# Altium PCB Layout.PcbDoc
Units mm, origin at the board's own origin, x right, y up, seen from the top; angles counter-clockwise.
Board outline 68.5 x 50 mm, 4 copper layers (Top Layer, Ground Layer, Signal Layer, Bottom Layer), stack 1.591 mm thick; 69 components, 34 nets, 219 pads, 163 vias.
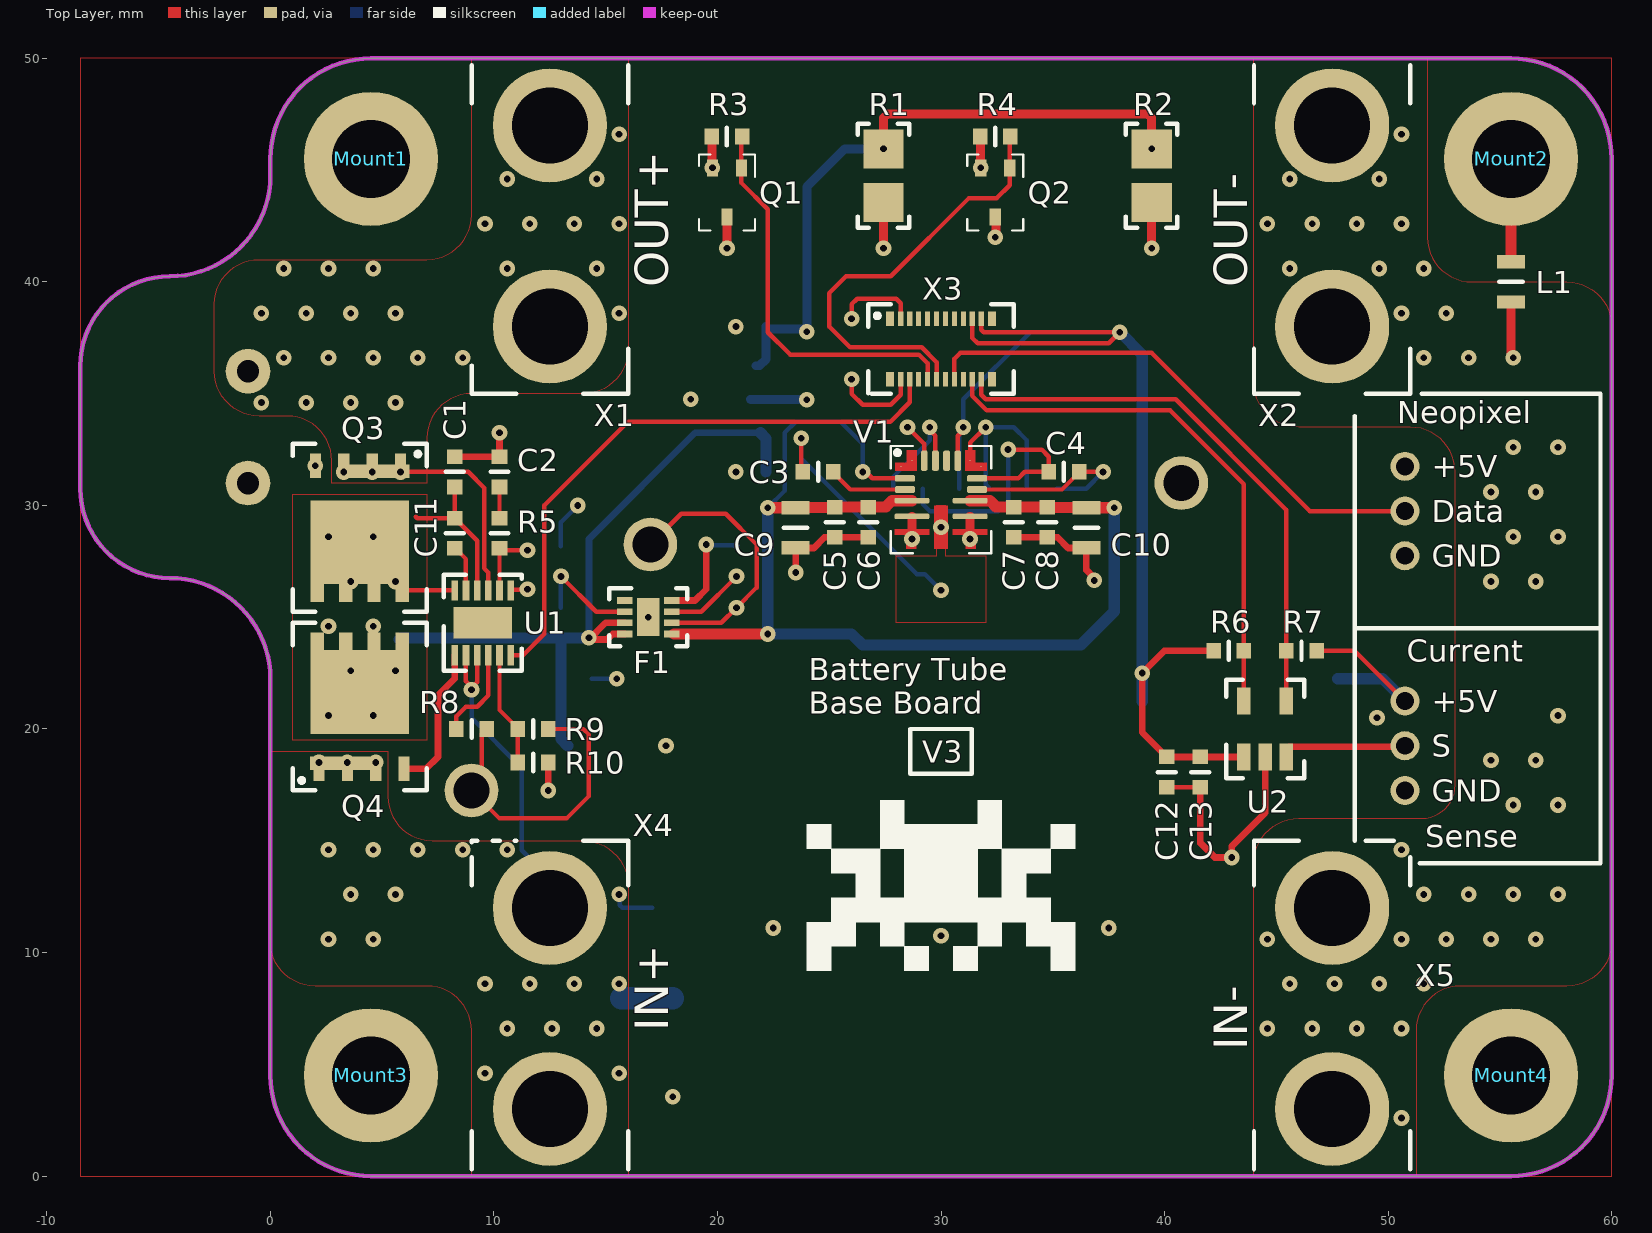
[diagram p0: Top Layer view]
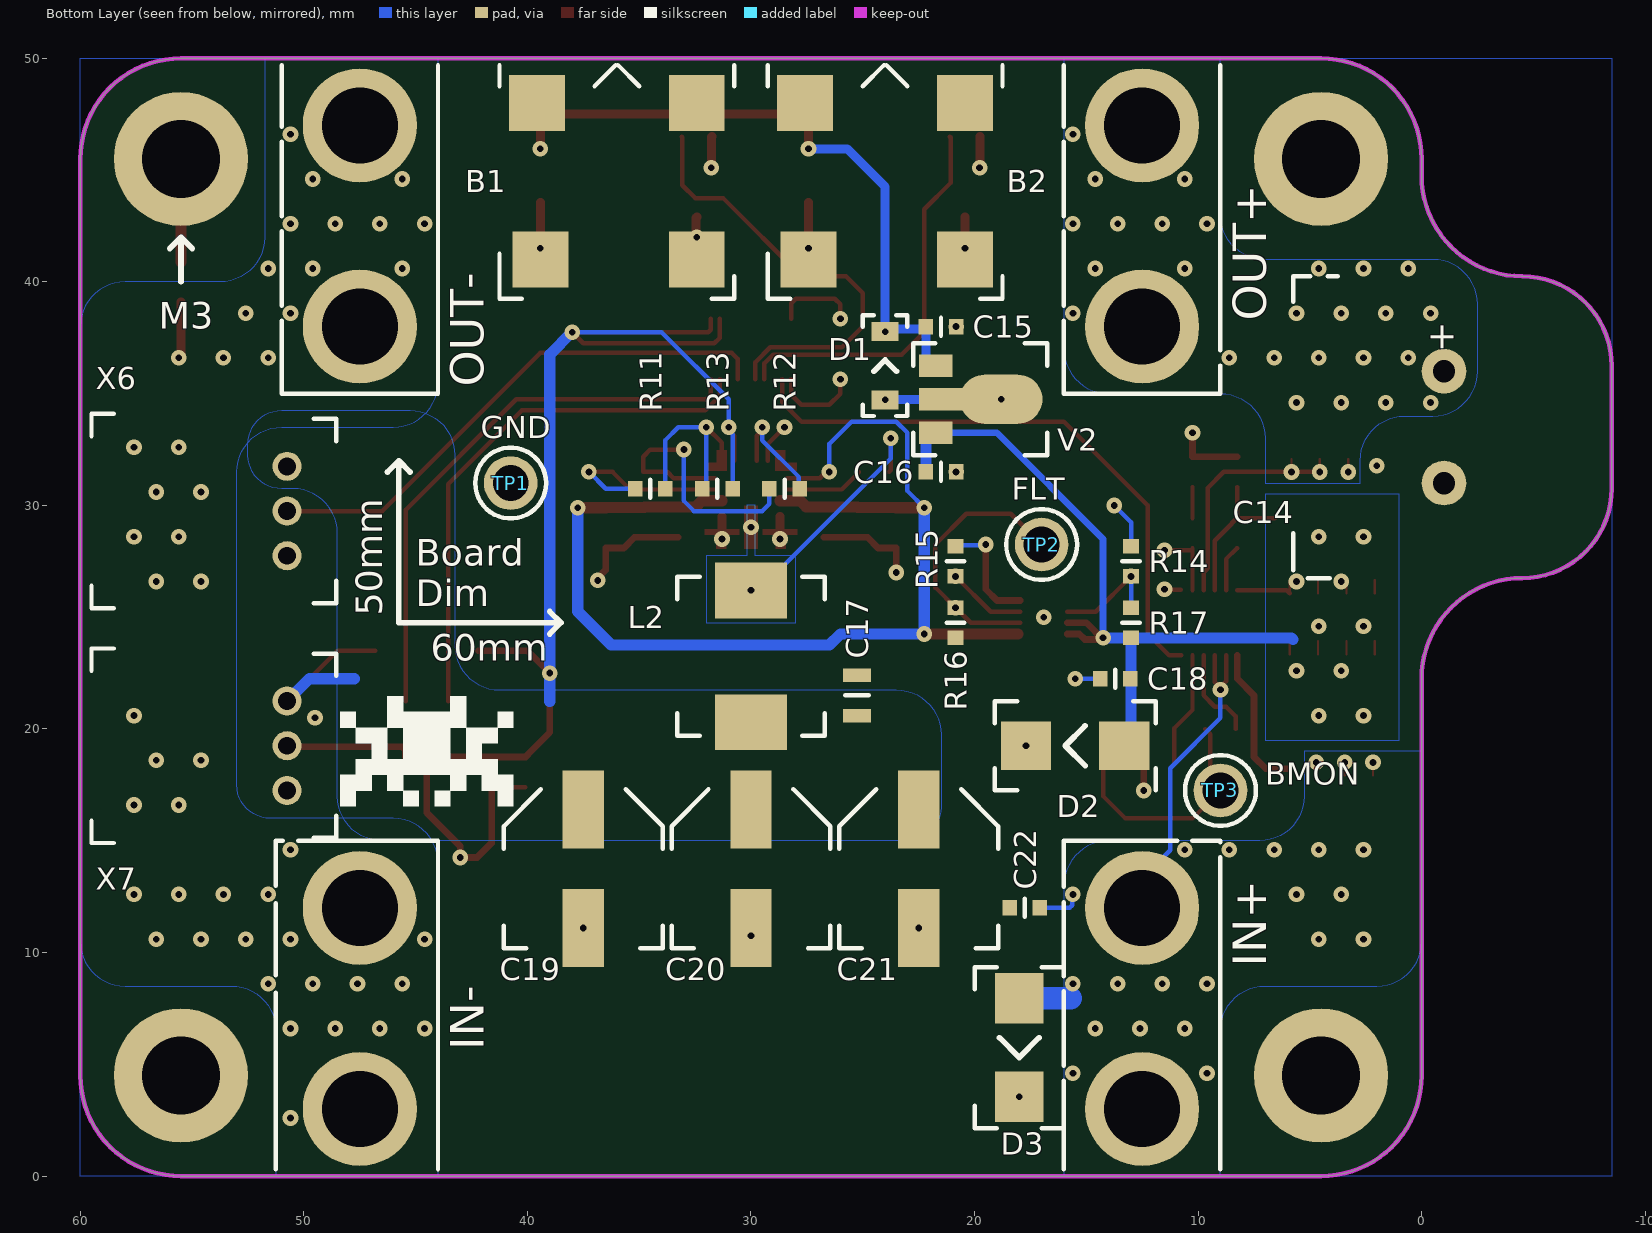
[diagram p1: Bottom Layer view, seen from below]
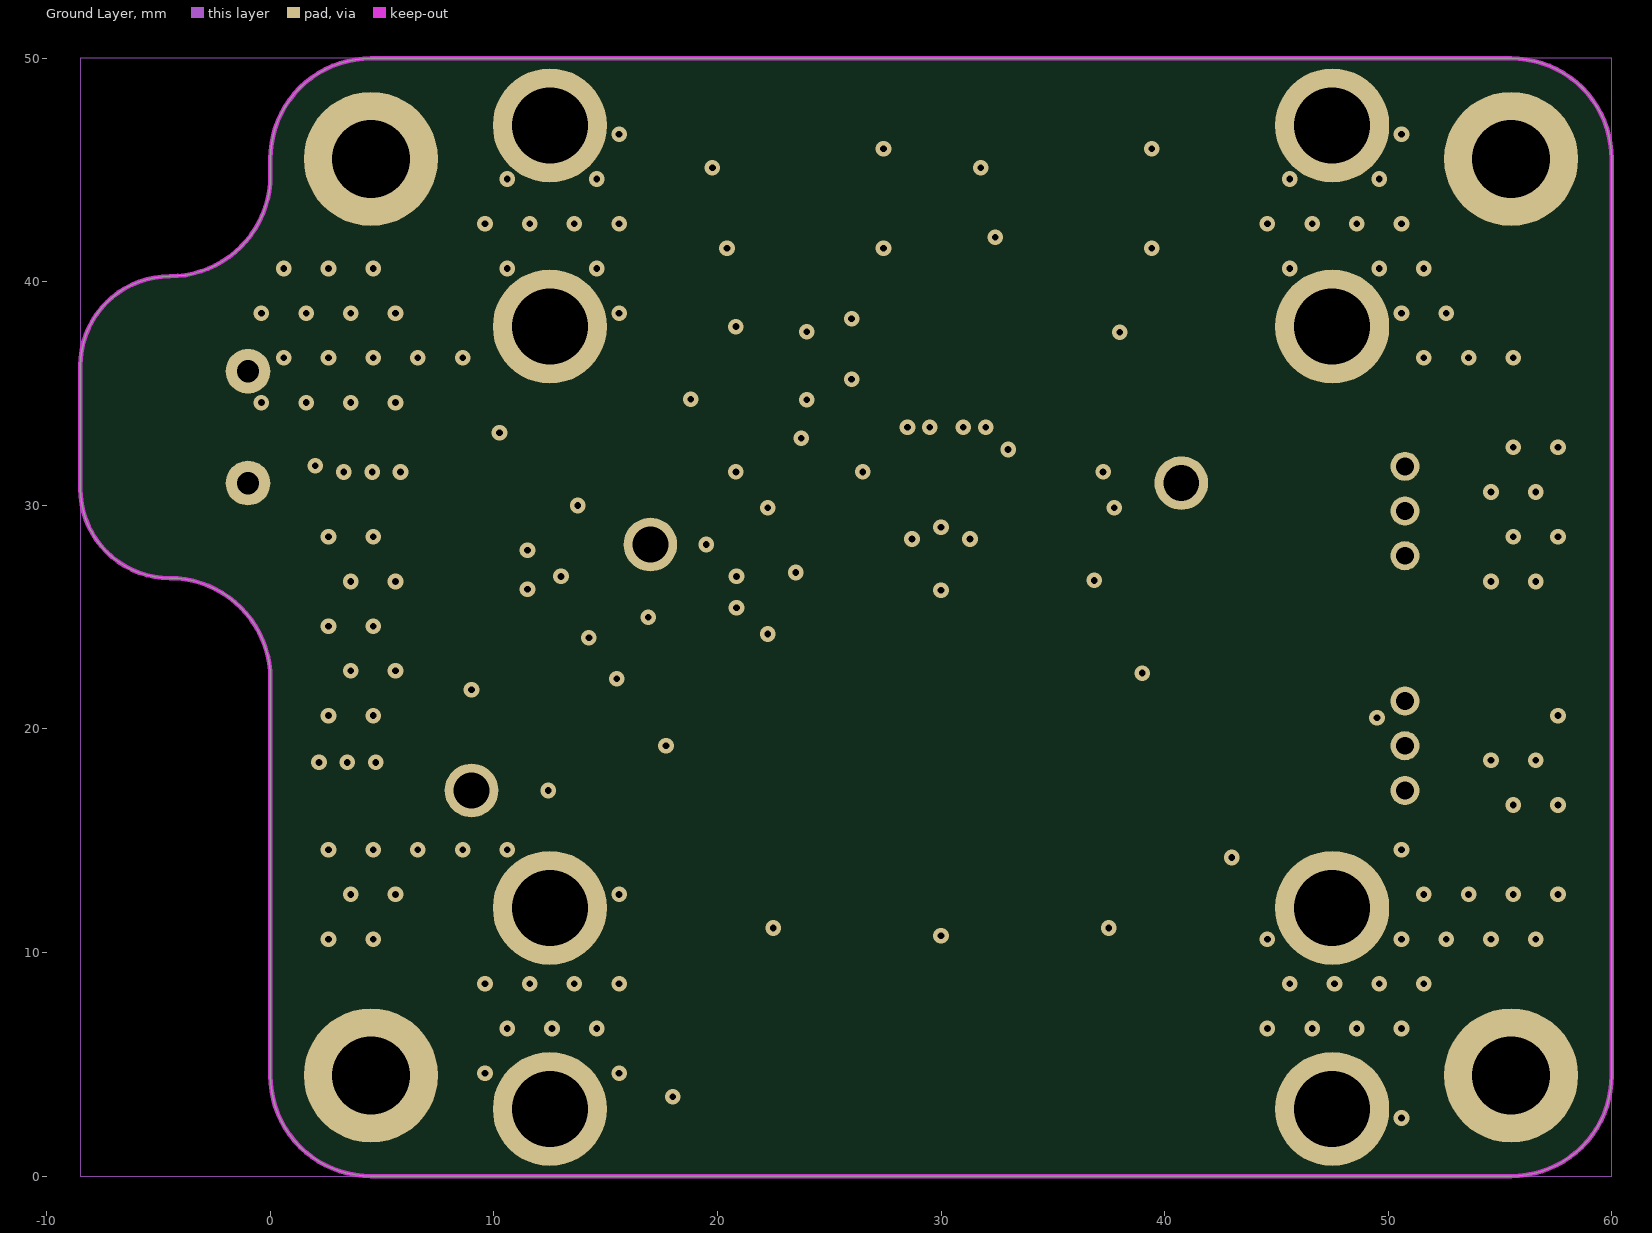
[diagram p2: Ground Layer]
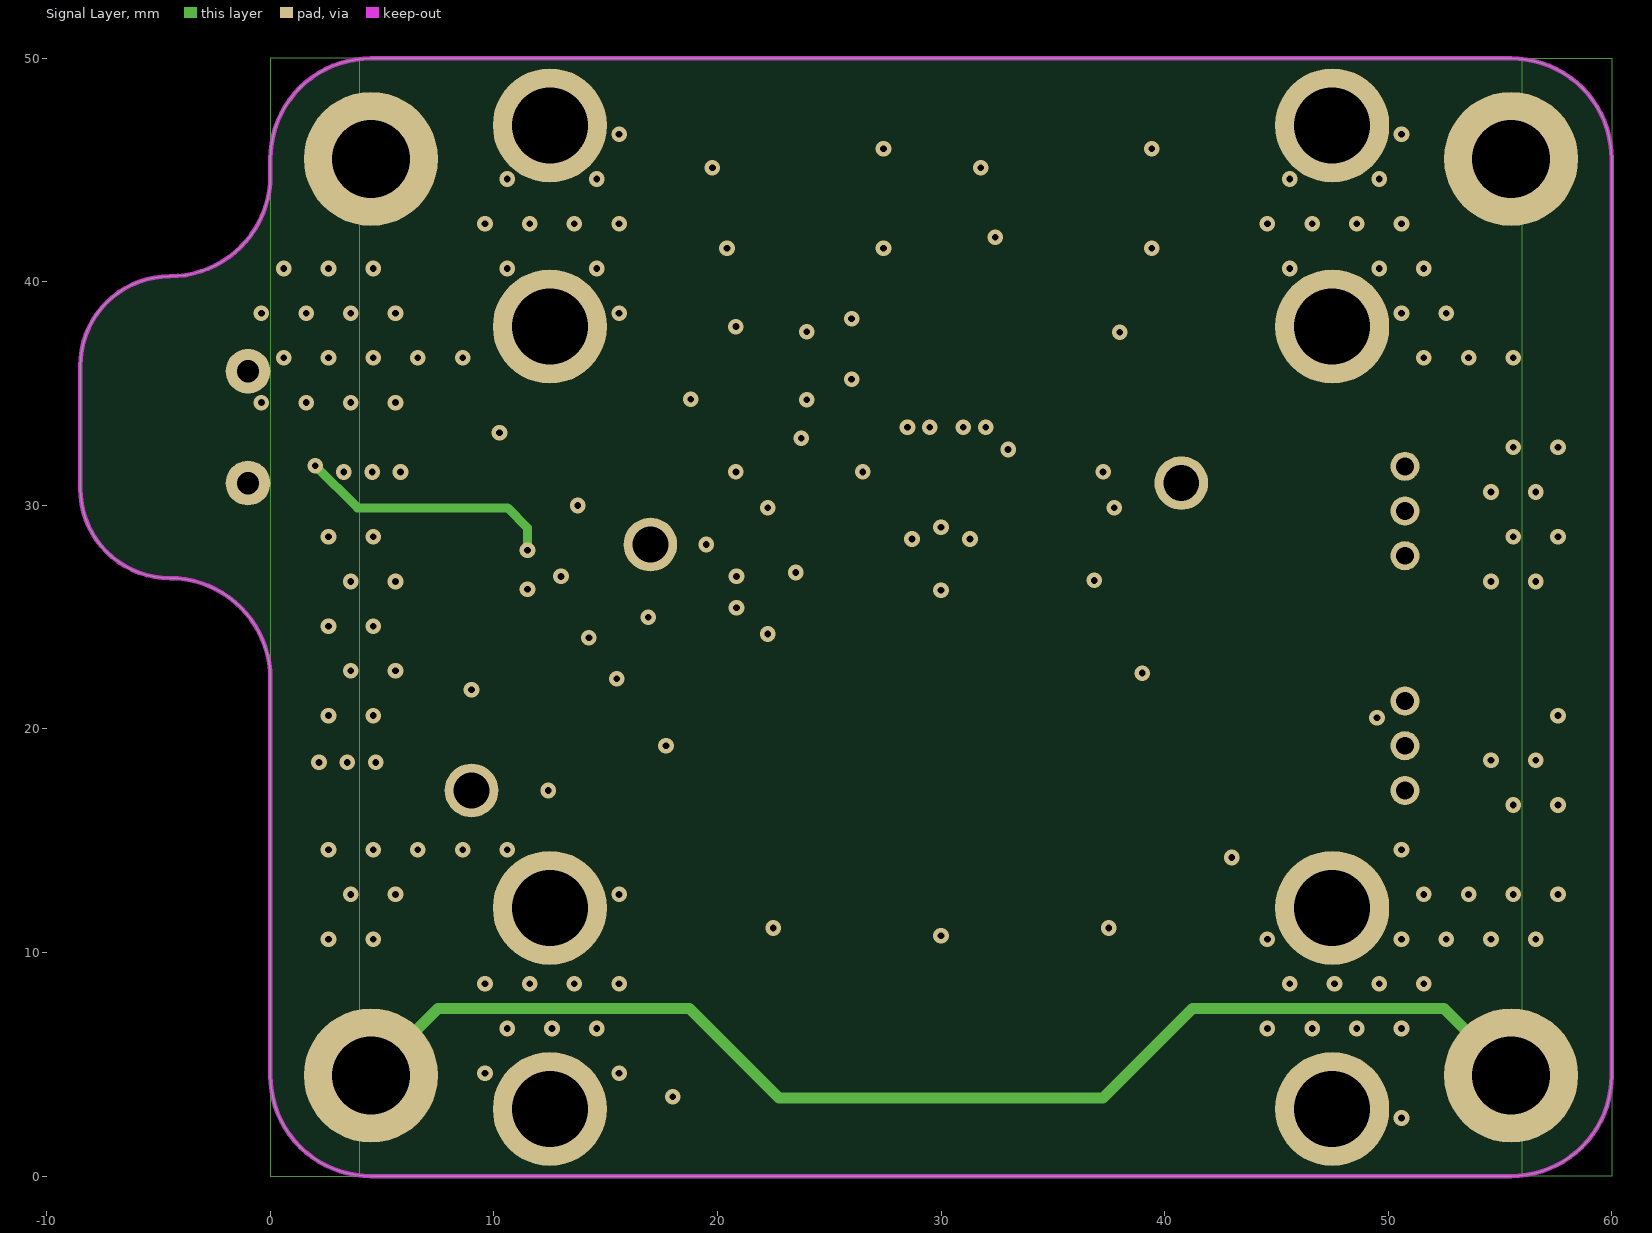
[diagram p3: Signal Layer]

## Layer stack, top to bottom
Top Solder: solder mask 0.0102, Solder Resist, Dk 3.8
Top Layer: signal copper 0.035
Dielectric 2: prepreg 0.2104, 7628*1, Dk 4.4
Ground Layer: signal copper 0.0175
Dielectric 1: dielectric 1.065, FR-4, Dk 4.8
Signal Layer: signal copper 0.0175
Dielectric 3: prepreg 0.2104, 7628*1, Dk 4.4
Bottom Layer: signal copper 0.035
Bottom Solder: solder mask 0.0102, Solder Resist, Dk 3.8

## Board outline
-8.5,30.75 -8.5,36.25 cw(c-4.5,36.25) -4.5,40.25 ccw(c-4.5,44.75) 0,44.75 0,45.5 cw(c4.5,45.5) 4.5,50 55.5,50 cw(c55.5,45.5) 60,45.5 60,4.5 cw(c55.5,4.5) 55.5,0 4.5,0 cw(c4.5,4.5) 0,4.5 0,22.25 ccw(c-4.5,22.25) -4.5,26.75 cw(c-4.5,30.75)

## Design rules (kind name [scope] priority, off if disabled: settings)
BoardOutlineClearance [All] p1: gap=0.2 ignorepadtopadclearanceinfootprint=FALSE
Clearance "inPolygon Clearance" [InPolygon] p1: gap=0.3 ignorepadtopadclearanceinfootprint=TRUE // this rule ensures that every net within a polygon of a different net has a set clearance from the poly
Clearance "High Current Polygon Clearance" [(InPolygon AND InNetClass('High_Current_Nets'))] p2: gap=0 ignorepadtopadclearanceinfootprint=TRUE // this rule ensures that every net within a polygon of a different net has a set clearance from the poly
Clearance "Different Diff Pair" [All] p3: gap=0.2 ignorepadtopadclearanceinfootprint=TRUE
Clearance "Same Diff Pair" [All] p4: gap=0.1 ignorepadtopadclearanceinfootprint=TRUE
Clearance "Different Nets" [not InAnyDifferentialPair] p5: gap=0.3 ignorepadtopadclearanceinfootprint=TRUE except(0.1: Arc-SMDPad Arc-THPad Arc-Via Arc-Text Track-SMDPad Track-THPad Track-Via Track-Text SMDPad-Text THPad-Text Via-Text Fill-Text Poly-Text Region-Text Text-Text; 0.12: Arc-Arc Arc-Track Track-Track; 0.15: SMDPad-SMDPad SMDPad-THPad SMDPad-Via THPad-THPad THPad-Via Via-Via; 0.2: Arc-Hole Track-Hole SMDPad-Hole THPad-Hole Via-Hole Fill-Hole Poly-Hole Region-Hole Text-Hole)
Clearance "Same Net" [not InAnyDifferentialPair] p6: gap=0 ignorepadtopadclearanceinfootprint=TRUE except(0.1: THPad-Via; 0.18: Arc-Arc Arc-Track Track-Track)
ComponentClearance [All] p1: gap=0.102 collisioncheckmode=3 verticalgap=0.102 showdistances=TRUE
DiffPairsRouting "Ethernet Routing" [InDifferentialPairClass('Ethernet_Pairs')] p1: maxlimit=0.25 minlimit=0.2 mostfreqgap=0.25 toplayer_maxgap=0.2 toplayer_prefgap=0.2 toplayer_minwidth=0.25 toplayer_maxwidth=0.25 toplayer_prefwidth=0.25 midlayer1_mingap=0.25 midlayer1_minwidth=0.19 midlayer1_maxwidth=0.19 midlayer1_prefwidth=0.19 midlayer2_mingap=0.25 midlayer2_minwidth=0.19 midlayer2_maxwidth=0.19 midlayer2_prefwidth=0.19 bottomlayer_maxgap=0.2 bottomlayer_prefgap=0.2 bottomlayer_minwidth=0.25 bottomlayer_maxwidth=0.25 bottomlayer_prefwidth=0.25 impedanceprofiledriven=TRUE maxuncoupledlength=12.7
DiffPairsRouting "USB Routing" [InDifferentialPairClass('USB_Pairs')] p2: maxlimit=0.291 minlimit=0.127 mostfreqgap=0.291 toplayer_maxgap=0.127 toplayer_prefgap=0.127 toplayer_minwidth=0.23 toplayer_maxwidth=0.23 toplayer_prefwidth=0.23 midlayer1_mingap=0.291 midlayer1_minwidth=0.25 midlayer1_maxwidth=0.25 midlayer1_prefwidth=0.25 midlayer2_mingap=0.291 midlayer2_minwidth=0.25 midlayer2_maxwidth=0.25 midlayer2_prefwidth=0.25 bottomlayer_maxgap=0.127 bottomlayer_prefgap=0.127 bottomlayer_minwidth=0.23 bottomlayer_maxwidth=0.23 bottomlayer_prefwidth=0.23 maxuncoupledlength=12.7
DiffPairsRouting "CAN Routing" [InDifferentialPairClass('CAN_Pairs')] p3: maxlimit=0.907 minlimit=0.5 mostfreqgap=0.907 toplayer_maxgap=0.5 toplayer_prefgap=0.5 toplayer_minwidth=0.201 toplayer_maxwidth=0.201 toplayer_prefwidth=0.201 midlayer1_mingap=0.907 midlayer1_minwidth=0.155 midlayer1_maxwidth=0.155 midlayer1_prefwidth=0.155 midlayer2_mingap=0.907 midlayer2_minwidth=0.155 midlayer2_maxwidth=0.155 midlayer2_prefwidth=0.155 bottomlayer_maxgap=0.5 bottomlayer_prefgap=0.5 bottomlayer_minwidth=0.201 bottomlayer_maxwidth=0.201 bottomlayer_prefwidth=0.201 impedanceprofiledriven=TRUE maxuncoupledlength=12.7
Height [All] p1: minheight=0 maxheight=1816.048 prefheight=12.7
HoleSize [All] p1: absolutevalues=TRUE maxlimit=6.3 minlimit=0.3 maxpercent=80.000 minpercent=20.000
HoleToHoleClearance [All] p1: gap=0.25 allowstackedmicrovias=FALSE
MatchedLengths "XTAL Nets Matched Delays" [InNetClass('XTAL_Nets')] p1: tolerance=25.4 checknetsindiffpair=FALSE checkdiffpairvsdiffpair=TRUE checkxsignals=TRUE checkothers=TRUE usedelayunits=TRUE delaytolerance=10.000000
MatchedLengths "Diff Pair Matched Delays" [InDifferentialPairClass('Ethernet_Pairs') or InDifferentialPairClass('USB_Pairs') or InDifferentialPairClass('CAN_Pairs')] p2: tolerance=5 checknetsindiffpair=TRUE checkdiffpairvsdiffpair=FALSE checkxsignals=FALSE checkothers=FALSE usedelayunits=TRUE delaytolerance=100.000000 phasematching=TRUE phasedelaytolerance=5.000000 phasedistance=12.7
MinimumAnnularRing [All] p1: minimumring=0.2
MinimumSolderMaskSliver [All] p1: minsoldermaskwidth=0
PlaneClearance "Supply Net Clearance" [InNetClass('Supply_Nets')] p1: clearance=0.5
PlaneClearance "All Nets" [All] p2: clearance=0.3
PolygonConnect "High Current" [InNetClass('High_Current_Nets')] p1: thpad.connectstyle=Relief thpad.reliefconductorwidth=0.4 thpad.reliefentries=4 thpad.polygonreliefangle="90 Angle" thpad.airgapwidth=0.1 thpad.conductorbypadedge=TRUE thpad.mindistance=0.381 thpad.enablemindistance=FALSE smdpad.connectstyle=Direct smdpad.reliefconductorwidth=0.254 smdpad.reliefentries=4 smdpad.polygonreliefangle="90 Angle" smdpad.airgapwidth=0.254 via.connectstyle=Direct via.reliefconductorwidth=0.254 via.reliefentries=4 via.polygonreliefangle="90 Angle" via.airgapwidth=0.254
PolygonConnect "Supply Nets" [InNetClass('Supply_Nets')] p2: connectstyle=Relief reliefconductorwidth=0.3 reliefentries=4 polygonreliefangle="90 Angle" conductorbypadedge=TRUE mindistance=0.381 enablemindistance=FALSE airgapwidth=0.254
PolygonConnect General [All] p3: connectstyle=Relief reliefconductorwidth=0.254 reliefentries=4 polygonreliefangle="90 Angle" airgapwidth=0.254
RoutingVias [All] p1: holewidth=0.2 width=0.35 viastyle="Through Hole" minholewidth=0.15 minwidth=0.3 maxholewidth=6.3 maxwidth=6.55
SilkToSilkClearance [All] p1: silktosilkclearance=0
SilkToSolderMaskClearance [All] p1: minsilkscreentomaskgap=0 clearancetoexposedcopper=TRUE
SolderMaskExpansion [All] p1: expansion=0.075 istentingtop=FALSE
SupplyNets "Schematic Supply Nets_2" [InNet('+12V')] p1: voltage=0.000
SupplyNets "Schematic Supply Nets_3" [InNet('GND')] p2: voltage=0.000
SupplyNets "Schematic Supply Nets_1" [InNet('Earth')] p3: voltage=0.000
UnRoutedNet [All] p1: checkbadconnections=TRUE
Width "nRF Width" [InNetClass('nRF Signal')] p1: maxlimit=0.379 minlimit=0.263 preferedwidth=0.379 toplayer_minwidth=0.379 midlayer1_maxwidth=0.263 midlayer1_prefwidth=0.263 midlayer2_maxwidth=0.263 midlayer2_prefwidth=0.263 bottomlayer_minwidth=0.379 impedanceprofiledriven=TRUE minimp=50.000000 maximp=50.000000 favimp=50.000000 checkconnectedcopper=TRUE
Width [All] p2: maxlimit=100 minlimit=0.1 preferedwidth=0.2
20 further rules are at their usual default settings.

## Classes and differential pairs
component class "Current Sensor ADC": C12 C13 R6 R7 U2
component class Buzzer: B1 B2 Q1 Q2 R1 R2 R3 R4
net class High_Current_Nets: +5V_VIN BATT_always_on BATT_IN BATT_switched CAP DGATE GND HGATE NetC2_2 NetC3_2 VREG_IN
component class Power: C3 C4 C5 C6 C7 C8 C9 C10 C15 C16 C17 C18 C19 C20 C21 D1 D2 F1 L2 R11 R12 R13 R14 R15 R16 R17 V1 V2
component class ORing: C1 C2 C11 C14 C22 D3 Q3 Q4 R5 R8 R9 R10 U1
net class Supply_Nets: +12V BATT_always_on Earth GND
component class Connections: L1 Mount1 Mount2 Mount3 Mount4 TP1 TP2 TP3 X1 X2 X3 X4 X5 X6 X7

## Components (designator, comment, footprint, x,y, rotation, side; value= is the part's Value field where it differs from the comment)
B1 "Passive buzzer" "[Buzzer] Passive SMD 12V 80mA" 36,44.5 r90 bottom
B2 "Passive buzzer" "[Buzzer] Passive SMD 12V 80mA" 24,44.5 r90 bottom
C1 "[Cap] 0603 0.1uF 10% 50V" "[Cap] SMD 0603" 8.25,31.5 r270 top
C2 "[Cap] 0603 0.01uF 10% 50V" "[Cap] SMD 0603" 10.25,31.5 r270 top
C3 "[Cap] 0603 0.1uF 10% 50V" "[Cap] SMD 0603" 24.5,31.5 r180 top
C4 "[Cap] 0603 2.2uF 10% 25V" "[Cap] SMD 0603" 35.5,31.5 r180 top
C5 "[Cap] 0603 4.7uF 10% 25V" "[Cap] SMD 0603" 25.25,29.25 r90 top
C6 "[Cap] 0603 0.1uF 10% 50V" "[Cap] SMD 0603" 26.75,29.25 r90 top
C7 "[Cap] 0603 0.1uF 10% 50V" "[Cap] SMD 0603" 33.25,29.25 r90 top
C8 "[Cap] 0603 4.7uF 10% 25V" "[Cap] SMD 0603" 34.75,29.25 r90 top
C9 "[Cap] 0805 22uF 20% 25V" "[Cap] SMD 0805" 23.5,29 r90 top
C10 "[Cap] 0805 22uF 20% 25V" "[Cap] SMD 0805" 36.5,29 r90 top
C11 "[Cap] 0603 0.1uF 10% 50V" "[Cap] SMD 0603" 8.25,28.75 r90 top
C12 "[Cap] 0603 10uF 20% 16V" "[Cap] SMD 0603" 40.1,18.075 r90 top
C13 "[Cap] 0603 0.1uF 10% 50V" "[Cap] SMD 0603" 41.6,18.075 r90 top
C14 "[Cap] Thru-Hole 1000uF 20% 35V" "[Cap] Thru-Hole Polarized 10mm" -1,33.5 r270 bottom
C15 "[Cap] 0603 0.1uF 10% 50V" "[Cap] SMD 0603" 21.5,38 r0 bottom
C16 "[Cap] 0603 0.33uF 10% 50V" "[Cap] SMD 0603" 21.5,31.5 r0 bottom
C17 "[Cap] 0805 22uF 20% 25V" "[Cap] SMD 0805" 25.25,21.5 r270 bottom
C18 "[Cap] 0603 0.1uF 10% 50V" "[Cap] SMD 0603" 13.7,22.25 r180 bottom
C19 "[Cap] 6.3mm 47uF 20% 35V" "[Cap] SMD Polarized, 6.3mm" 37.5,13.75 r270 bottom
C20 "[Cap] 6.3mm 47uF 20% 35V" "[Cap] SMD Polarized, 6.3mm" 30,13.75 r270 bottom
C21 "[Cap] 6.3mm 47uF 20% 35V" "[Cap] SMD Polarized, 6.3mm" 22.5,13.75 r270 bottom
C22 "[Cap] 0603 0.1uF 10% 50V" "[Cap] SMD 0603" 17.75,12 r180 bottom
D1 "SOD-123F" "[Diode] SOD-123F" 24,36.25 r90 bottom
D2 "DO-214AA" "[Diode] SMD DO-214AA" 15.5,19.25 r0 bottom
D3 "DO-214AA" "[Diode] SMD DO-214AA" 18,5.75 r270 bottom
F1 "[E-Fuse] 3-18V 4A" "[E-Fuse] 3-18V 4A" 16.9,25 r0 top
L1 "652-MH2029-300Y" "[Ferrite] SMD 0805" 55.5,40 r270 top
L2 "[2.2uH] SMD Nonstandard 10A" "[Inductor] SMD 7.4 X 6.6 X 3 MM" 30,23.25 r270 bottom
Mount1 "M3 Mount Hole" "[Mount] M3 Mount Hole" 4.5,45.5 r0 top
Mount2 "M3 Mount Hole" "[Mount] M3 Mount Hole" 55.5,45.5 r0 top
Mount3 "M3 Mount Hole" "[Mount] M3 Mount Hole" 4.5,4.5 r0 top
Mount4 "M3 Mount Hole" "[Mount] M3 Mount Hole" 55.5,4.5 r0 top
Q1 "[NMOS] SMD 20V 1.4A 160mOhm" SOT323 20.424,44 r270 top
Q2 "[NMOS] SMD 20V 1.4A 160mOhm" SOT323 32.424,44 r270 top
Q3 "[NMOS] SMD 40V 175A 0.55mOhm" "[NMOS] SMD 40V 175A 0.55mOhm" 4,29 r180 top
Q4 "[NMOS] SMD 40V 175A 0.55mOhm" "[NMOS] SMD 40V 175A 0.55mOhm" 4,21 r0 top
R1 "[100] SMD 1206 0.5% 1W" "[Res] SMD 1206" 27.424,44.75 r90 top
R2 "[100] SMD 1206 0.5% 1W" "[Res] SMD 1206" 39.424,44.75 r90 top
R3 "[1M] SMD 0603 1% 1/10W" "[Res] SMD 0603" 20.424,46.5 r0 top
R4 "[1M] SMD 0603 1% 1/10W" "[Res] SMD 0603" 32.424,46.5 r0 top
R5 "[100] SMD 0603 1% 1/10W" "[Res] SMD 0603" 10.25,28.75 r90 top
R6 "[1k] SMD 0603 1% 1/10W" "[Res] SMD 0603" 42.875,23.5 r180 top (schematic designator R7)
R7 "[1k] SMD 0603 1% 1/10W" "[Res] SMD 0603" 46.125,23.5 r0 top (schematic designator R6)
R8 "[90.9k] SMD 0603 1% 1/10W" "[Res] SMD 0603" 9,20 r180 top
R9 "[9.09k] SMD 0603 1% 1/10W" "[Res] SMD 0603" 11.75,20 r0 top
R10 "[3.48k] SMD 0603 1% 1/10W_1" "[Res] SMD 0603" 11.75,18.5 r0 top
R11 "[10k] SMD 0603 1% 1/8W" "[Res] SMD 0603" 34.5,30.75 r180 bottom
R12 "[1k] SMD 0603 1% 1/10W" "[Res] SMD 0603" 28.5,30.75 r180 bottom (schematic designator R13)
R13 "[52.3k] SMD 0603 1% 1/10W" "[Res] SMD 0603" 31.5,30.75 r180 bottom (schematic designator R12)
R14 "[392k] SMD 0603 1% 1/10W" "[Res] SMD 0603" 13,27.5 r270 bottom
R15 "[698] SMD 0603 1% 1/10W_1" "[Res] SMD 0603" 20.85,27.5 r270 bottom
R16 "[10k] SMD 0603 1% 1/8W" "[Res] SMD 0603" 20.85,24.75 r90 bottom
R17 "[1k] SMD 0603 1% 1/10W" "[Res] SMD 0603" 13,24.75 r270 bottom
TP1 "[THM] Thru-Hole" "[THM] White" 40.75,31 r180 bottom
TP2 "[THM] Thru-Hole" "[THM] White" 17,28.25 r180 bottom
TP3 "[THM] Thru-Hole" "[THM] White" 9,17.25 r180 bottom
U1 "[ORing] Back-to-Back External NMOS Controller" "[ORing] Back-to-Back External NMOS Controller" 9.5,24.75 r90 top
U2 "[ADC] 2.7-5.5V 12bit Single-Ended" "[ADC] 2.7-5.5V 12bit Single-Ended" 44.5,20 r90 top
V1 "[Switching] SMD 0.8-10V Adjustable" "[Switching] 0.8-10V Adjustable Buck" 30,30.263 r0 top
V2 "[Linear] SMD 12V 0.1A" "[Linear] SMD 12V 0.1A" 19.75,34.75 r270 bottom
X1 "[Lug] 2pin M3 35A" "[Lug] 2pin M3 35A" 12.5,42.5 r90 top
X2 "[Lug] 2pin M3 35A" "[Lug] 2pin M3 35A" 47.5,42.5 r90 top
X3 "[Mezzanine] 20pin 0.4mm Female" "[Mezzanine] 20pin 0.4mm Female" 30,37 r0 top
X4 "[Lug] 2pin M3 35A" "[Lug] 2pin M3 35A" 12.5,7.5 r90 top
X5 "[Lug] 2pin M3 35A" "[Lug] 2pin M3 35A" 47.5,7.5 r90 top
X6 "[Sherlock] 3pin 90deg" "[Sherlock] 3pin 90deg" 50.75,29.75 r90 bottom
X7 "[Sherlock] 3pin 90deg" "[Sherlock] 3pin 90deg" 50.75,19.25 r90 bottom

## Footprints (in the part's own frame and the unit in brackets; to place one, negate y for a bottom-side part, rotate by r counter-clockwise, add the part's x,y. Pads: shape width x height; smd on the part's side, far side on the other; paste and mask are expansions set on the pad)
"[ADC] 2.7-5.5V 12bit Single-Ended" [mm] "MCP3221A0T-E/OT"
  rect 1.2x0.6 smd: 1(-1.25,0.95) 2(-1.25,0) 3(-1.25,-0.95) 4(1.25,-0.95) 5(1.25,0.95)
  silkscreen extent -2.2,-1.75 2.2,1.75, body extent -1.4,-1.45 1.4,1.45, height 1.2
"[Buzzer] Passive SMD 12V 80mA" [mm] "CT08E-16S400-2"
  rect 2.5x2.5 smd: 1(-3.5,3.424) 2(-3.5,-3.576) MP(3.5,-3.576) MP(3.5,3.576)
  silkscreen extent -5.25,-5.25 5.2,5.25, body extent -4.25,-4.25 4.25,4.25, height 4
"[Cap] SMD 0603" [mm]
  rect 0.65x0.7 smd: 1(-0.675,0) 2(0.675,0)
  silkscreen extent 0,-0.4 0,0.4, body extent -0.8,-0.45 0.8,0.45, height 0.8
"[Cap] SMD 0805" [mm]
  rect 0.6x1.25 smd: 1(-0.9,0) 2(0.9,0)
  silkscreen extent 0,-0.53 0,0.53, body extent -1,-0.63 1,0.63, height 1
"[Cap] SMD Polarized, 6.3mm" [mm]
  rect 3.5x1.85 smd: 1(-2.65,0) 2(2.65,0)
  silkscreen extent -3.55,-3.55 3.55,3.55, body extent -3.7,-3.4 3.7,3.4, height 6.1
"[Cap] Thru-Hole Polarized 10mm" [mm]
  round 2 hole 1: 1(-2.5,0) 2(2.5,0)
  silkscreen extent -6.75,-6.75 6.75,-4.75, body extent -6.5,-6.49 6.5,6.49, height 26.5
"[Diode] SMD DO-214AA" [mm]
  rect 2.25x2.15 smd: 1(2.2,0) 2(-2.2,0)
  silkscreen extent -3.6,-2 3.6,2, body extent -2.68,-1.75 2.68,1.75, height 2.3
"[Diode] SOD-123F" [mm]
  rect 0.85x1.2 smd: 1(1.525,0) 2(-1.525,0)
  silkscreen extent -2.25,-1 2.25,1, body extent -1.75,-0.8 1.75,0.8, height 0.8
"[E-Fuse] 3-18V 4A" [mm] "TPS259571DSGR"
  rect 0.7x0.3 smd: 1(-1.05,0.75) 2(-1.05,0.25) 3(-1.05,-0.25) 4(-1.05,-0.75) 5(1.05,-0.75) 6(1.05,-0.25) 7(1.05,0.25) 8(1.05,0.75)
  rect 1x1.7 smd: 9(0,0)
  silkscreen extent -1.75,-1.3 1.75,1.3, body extent -1.05,-1 1.05,1, height 0.8
"[Ferrite] SMD 0805" [mm]
  rect 0.6x1.25 smd: 1(-0.9,0) 2(0.9,0)
  silkscreen extent 0,-0.53 0,0.53, body extent -1,-0.6 1,0.6, height 1.1
"[Inductor] SMD 7.4 X 6.6 X 3 MM" [mm]
  rect 2.5x3.2 smd: 1(-2.95,0) 2(2.95,0)
  silkscreen extent -3.55,-3.3 3.55,3.3, body extent -3.55,-3.3 3.55,3.3, height 3
"[Linear] SMD 12V 0.1A" [mm] "L78L12ACUTR"
  rect 1x1.5 smd paste-2 mask+0: 1(-1.499,-1.981) 3(1.499,-1.981)
  rect 1x2 smd paste-2 mask+0: 2(0,-1.727)
  oval 2.2x3.7 smd paste-3: 2(0,0.94)
  silkscreen extent -2.5,-3 2.5,3, body extent -2.25,-2.27 2.25,1.83, height 1.6
"[Lug] 2pin M3 35A" [mm] "AMT0230003TH0000G"
  round 5.1 hole 3.4: 1(-4.5,0) 1(4.5,0)
  silkscreen extent -7.5,-3.5 7.2,3.5, body extent -5,-3.2 5,3.2, height 5.33
"[Mezzanine] 20pin 0.4mm Female" [mm] "DF40C-20DP-0.4V(51)"
  rect 0.23x0.66 smd paste+0 mask+0.102: 1(-1.8,1.355) 2(-1.8,-1.355) 3(-1.4,1.355) 4(-1.4,-1.355) 5(-1,1.355) 6(-1,-1.355) 7(-0.6,1.355) 8(-0.6,-1.355) 9(-0.2,1.355) 10(-0.2,-1.355) 11(0.2,1.355) 12(0.2,-1.355) 13(0.6,1.355) 14(0.6,-1.355) 15(1,1.355) 16(1,-1.355) 17(1.4,1.355) 18(1.4,-1.355) 19(1.8,1.355) 20(1.8,-1.355)
  rect 0.35x0.66 smd paste+0 mask+0.102: MP(-2.275,-1.355) MP(-2.275,1.355) MP(2.275,-1.355) MP(2.275,1.355)
  silkscreen extent -3.25,-2 3.25,2, body extent -2.76,-1.48 2.76,1.49, height 1.14
"[Mount] M3 Mount Hole" [mm]
  round 6 hole 3.5: 1(0,0)
"[NMOS] SMD 40V 175A 0.55mOhm" [mm] "IAUCN04S7N005ATMA1"
  rect 0.5x0.5 smd: 1(-1.825,-3.075) 1(-0.555,-3.075) 1(0.715,-3.075)
  rect 3.2x0.6 smd: 1(-0.635,-2.525)
  rect 0.5x1.1 smd: 2(1.985,-2.775)
  rect 0.6x0.8 smd: 3(-1.905,2.925) 3(-0.635,2.925) 3(0.635,2.925) 3(1.905,2.925)
  rect 4.41x3.75 smd: 3(0,0.65)
  Top Layer lines w0.1: 1.905,2.925 1.905,2.345 ; 0.715,-2.495 0.715,-3.075 ; 0.635,2.925 0.635,2.345 ; -0.555,-2.495 -0.555,-3.075 ; -0.635,2.925 -0.635,2.345 ; -1.825,-2.495 -1.825,-3.075 ; -1.905,2.925 -1.905,2.345
  silkscreen extent -3,-3.75 3,3.75, body extent -2.71,-3.22 2.71,3.22, height 1
"[ORing] Back-to-Back External NMOS Controller" [mm] "LM74810QDRRRQ1"
  rect 0.9x0.3 smd: 1(-1.45,1.25) 2(-1.45,0.75) 3(-1.45,0.25) 4(-1.45,-0.25) 5(-1.45,-0.75) 6(-1.45,-1.25) 7(1.45,-1.25) 8(1.45,-0.75) 9(1.45,-0.25) 10(1.45,0.25) 11(1.45,0.75) 12(1.45,1.25)
  rect 1.4x2.6 smd: 13(0,0)
  silkscreen extent -2.15,-1.75 2.15,1.75, body extent -1.5,-1.5 1.5,1.5, height 0.8
"[Res] SMD 0603" [mm]
  rect 0.65x0.7 smd: 1(-0.675,0) 2(0.675,0)
  silkscreen extent 0,-0.4 0,0.4, body extent -0.8,-0.45 0.8,0.45, height 0.8
"[Res] SMD 1206" [mm]
  rect 1.75x1.8 smd: 1(-1.2,0) 2(1.2,0)
  silkscreen extent -2.32,-1.15 2.32,1.15, body extent -1.6,-0.8 1.6,0.8, height 0.55
"[Sherlock] 3pin 90deg" [mm] "0353630360"
  round 1.3 hole 0.8: 1(2,0) 2(0,0) 3(-2,0)
  silkscreen extent -4.35,-2.2 4.35,8.75, body extent -4.85,-1.98 4.85,8.52, height 5.43
"[Switching] 0.8-10V Adjustable Buck" [mm] "MAX20408AFOF/VY+"
  rrect50% 0.9x0.3 smd: 1(-1.612,0.95) 2(-1.612,0.45) 10(1.612,0.45) 11(1.612,0.95)
  rrect50% 1.55x0.25 smd: 3(-1.299,-0.05) 4(-1.299,-0.75) 8(1.3,-0.75) 9(1.3,-0.05)
  round 0.025 smd: 5(-1.3,-1.763) 6(0,-1.238) 7(1.3,-1.763) 12(1.3,1.75) 12(1.787,1.475) 17(-1.788,1.475) 17(-1.3,1.75)
  rect 0.127x0.127 smd paste-0.064 mask-0.064: 10(1.612,0.45) 11(1.612,0.95)
  rrect50% 0.3x0.9 smd: 13(0.75,1.736) 14(0.25,1.736) 15(-0.25,1.737) 16(-0.75,1.737)
  Top Layer region: 2.05,1.65 1.525,1.65 1.525,1.3 2.05,1.3
  Top Layer region: 1.525,1.65 1.525,1.3 1.075,1.3 1.075,2.2 1.525,2.2
  Top Layer region: -2.05,1.65 -1.525,1.65 -1.525,1.3 -2.05,1.3
  Top Layer region: -1.525,1.65 -1.525,1.3 -1.075,1.3 -1.075,2.2 -1.525,2.2
  Top Layer region: 1.1,-1.575 0.525,-1.575 0.525,-1.325 2.075,-1.325 2.075,-1.575 1.55,-1.575 1.55,-2.2 1.1,-2.2
  Top Layer region: -1.1,-1.575 -0.525,-1.575 -0.525,-1.325 -2.075,-1.325 -2.075,-1.575 -1.55,-1.575 -1.55,-2.2 -1.1,-2.2
  Top Layer region: -0.3,-0.275 0.3,-0.275 0.3,-2.2 -0.3,-2.2
  silkscreen extent -2.25,-2.4 2.25,2.4, body extent -1.75,-1.88 1.75,1.88, height 0.8
"[THM] White" [mm] "5012"
  round 2.4 hole 1.6: 1(0,0)
  silkscreen extent -1.59,-1.58 1.59,1.58, body extent -1.58,-1.59 1.58,1.59, height 8.12
SOT323 [mm]
  rect 0.75x0.5 smd: 1(-1.1,0.65) 2(-1.1,-0.65) 3(1.1,0)
  silkscreen extent -1.7,-1.25 1.7,1.25, body extent -1.05,-1 1.05,1, height 1

## Part data
B1 B2: library part "[Buzzer] Passive SMD 12V 80mA", "CT08E-16S400-2", Supplier Part Number 1=2603-CT08E-16S400-2CT-ND, Supplier 1=DigiKey
C1 C3 C6 C7 C11 C13 C15 C18 C22: "CL10B104KB8NNNC", Capacitance=100nF, Max Voltage=50V, Size Package=0603, Supplier Part Number 1=1276-1000-6-ND, Tolerance=10%, Supplier 1=DigiKey
C2: "C0603C103K5RACTU", Capacitance=10nF, Max Voltage=50V, Size Package=0603, Supplier Part Number 1=399-C0603C103K5RACTUDKR-ND, Tolerance=10%, Supplier 1=DigiKey
C4: "GRM188R61E225KA12D", Capacitance=2.2uF, Max Voltage=25V, Size Package=0603, Supplier Part Number 1=490-10731-1-ND, Tolerance=10%, Supplier 1=DigiKey
C5 C8: "GRM188R61E475KE11D", Capacitance=4.7uF, Max Voltage=25V, Size Package=0603, Supplier Part Number 1=490-7203-6-ND, Tolerance=10%, Supplier 1=DigiKey
C9 C10 C17: "CL21A226MAYNNWE", Capacitance=22uF, Max Voltage=25V, Size Package=0805, Supplier Part Number 1=1276-CL21A226MAYNNWECT-ND, Tolerance=20%, Supplier 1=DigiKey
C12: "GRM188C81C106MA73D", Capacitance=10uF, Max Voltage=16V, Size Package=0603, Supplier Part Number 1=490-7198-1-ND, Tolerance=20%, Supplier 1=DigiKey
C14: "35PK1000MEFC10X20", Capacitance=1000uF, Max Voltage=35V, Size Package=Thru-Hole, Supplier Part Number 1=1189-1742-ND, Tolerance=20%, Supplier 1=DigiKey
C16: "CGA3E3X7R1H334K080AB", Capacitance=0.33uF, Max Voltage=50V, Size Package=0603, Supplier Part Number 1=445-174426-1-ND, Tolerance=10%, Supplier 1=DigiKey
C19 C20 C21: "UWT1V470MCL1GS", Capacitance=47uF, Max Voltage=35V, Size Package=6.3mm, Supplier Part Number 1=493-2202-1-ND, Tolerance=20%, Supplier 1=DigiKey
D1: library part "[Zener] SMD 12.75V 1W 5.88%", "KDZVTR12B", Optimal Zener Voltage=12.75V, Supplier Part Number 1=KDZVTR12BCT-ND, Tolerance=5.88%, Supplier 1=DigiKey, Wattage=1W
D2 D3: library part "[TVS] SMBJ33CA", "SMBJ33CA", Optimal Zener Voltage=33V, Supplier Part Number 1=SMBJ33CA-FDICT-ND, Supplier 1=DigiKey, Wattage=600W
F1: "TPS259571DSGR", Supplier Part Number 1=296-50500-1-ND, Supplier 1=DigiKey
L1: library part "[Ferrite] SMD 0805 3A 30ohm", Res @ Freq="30 @ 100MHz", Size Package=0805, Supplier Part Number 1=MH2029-300YCT-ND, Supplier 1=DigiKey
L2: "ECS-MPIL0630-2R2MC", Inductance=2.2uH, Package="7.4 x 6.6mm", Supplier Part Number 1=XC2402CT-ND, Supplier 1=DigiKey
Mount1 Mount2 Mount3 Mount4: library part "[Mount] M3 Mount Hole", "Place at least 4.5mm from board edge. Plated."
Q1 Q2: "BSS816NWH6327XTSA1", Supplier Part Number 1=BSS816NWH6327XTSA1CT-ND, Supplier 1=DigiKey
Q3 Q4: "IAUCN04S7N005ATMA1", Supplier Part Number 1=448-IAUCN04S7N005ATMA1CT-ND, Supplier 1=DigiKey
R1 R2: "HRG3216P-1000-D-T1", Resistance=100, Size Package=1206, Supplier Part Number 1=408-1865-1-ND, Tolerance=0.5%, Supplier 1=DigiKey, Wattage=1W
R3 R4: "RC0603FR-071ML", Resistance=1M, Size Package=0603, Supplier Part Number 1=311-1.00MHRDKR-ND, Tolerance=1%, Supplier 1=DigiKey, Wattage=1/10W
R5: "RC0603FR-07100RL", Resistance=100, Size Package=0603, Supplier Part Number 1=311-100HRDKR-ND, Tolerance=1%, Supplier 1=DigiKey, Wattage=1/10W
R6 R7 R12 R17: "RMCF0603FT1K00", Resistance=1k, Size Package=0603, Supplier Part Number 1=RMCF0603FT1K00DKR-ND, Tolerance=1%, Supplier 1=DigiKey, Wattage=1/10W
R8: "CR0603-FX-9092ELF", Resistance=90.9k, Size Package=0603, Supplier Part Number 1=CR0603-FX-9092ELFCT-ND, Tolerance=1%, Supplier 1=DigiKey, Wattage=1/10W
R9: "RMCF0603FT9K09", Resistance=9.09k, Size Package=0603, Supplier Part Number 1=RMCF0603FT9K09CT-ND, Tolerance=1%, Supplier 1=DigiKey, Wattage=1/10W
R10: "RMCF0603FT3K48", Resistance=3.48k, Size Package=0603, Supplier Part Number 1=RMCF0603FT3K48CT-ND, Tolerance=1%, Supplier 1=DigiKey, Wattage=1/10W
R11 R16: "RMCF0603FT10K0", Resistance=10k, Size Package=0603, Supplier Part Number 1=RMCF0603FT10K0DKR-ND, Tolerance=1%, Supplier 1=DigiKey, Wattage=1/10W
R13: "RC0603FR-0752K3L", Resistance=52.3k, Size Package=0603, Supplier Part Number 1=311-52.3KHRCT-ND, Tolerance=1%, Supplier 1=DigiKey, Wattage=1/10W
R14: "CR0603-FX-3923ELF", Resistance=392k, Size Package=0603, Supplier Part Number 1=118-CR0603-FX-3923ELFCT-ND, Tolerance=1%, Supplier 1=DigiKey, Wattage=1/10W
R15: "RMCF0603FT698R", Resistance=698, Size Package=0603, Supplier Part Number 1=RMCF0603FT698RCT-ND, Tolerance=1%, Supplier 1=DigiKey, Wattage=1/10W
TP1 TP2 TP3: "5012", Supplier Part Number 1=36-5012-ND, Supplier 1=DigiKey
U1: "LM74810QDRRRQ1", Supplier Part Number 1=296-LM74810QDRRRQ1CT-ND, Supplier 1=DigiKey
U2: "MCP3221A0T-E/OT", Supplier Part Number 1=MCP3221A0T-E/OTCT-ND, Supplier 1=DigiKey
V1: "MAX20408AFOF/VY+", Supplier Part Number 1=505-MAX20408AFOF/VY+-ND, Supplier 1=DigiKey
V2: "L78L12ACUTR", Supplier Part Number 1=497-1195-1-ND, Supplier 1=DigiKey
X1 X2 X4 X5: "AMT0230003TH0000G", Supplier Part Number 1=1818-AMT0230003TH0000G-ND, Supplier 1=DigiKey
X3: "DF40C-20DP-0.4V(51)", Supplier Part Number 1=H11618CT-ND, Supplier 1=DigiKey, System=Connector
X6 X7: "0353630360", Supplier Part Number 1=WM18932-ND, Supplier 1=DigiKey

## Via types
v1: diameter 0.7, hole 0.3, Top Layer to Bottom Layer, 163 vias

## Nets (pads, with @x,y where several pads share a name; then routed paths per layer and width w, separated by ;. In a path a pad name is that pad's centre, name@x,y a point inside that pad or via, vN(x,y) a via of type N, cw(c..) or ccw(c..) an arc to the next point about the centre after c; other vN are vias at no path point)
"+5V Reg BIAS": C4.2 R12.1 V1.11 | length 13.1
  Top Layer w0.2: V1.11@31.612,31.213 33.463,31.213 33.75,31.5 C4.2 34.825,32.175 34.5,32.5 v1(33,32.5)
  Bottom Layer w0.2: R12.1 29.175,30.075 29.5,29.75 32.55,29.75 33,30.2 v1(33,32.5)
"+5V Reg FB": R11.2 R13.1 V1.12 | length 9.4
  Top Layer w0.2: V1.12@31.787,31.738 31.575,31.738 31.3,32.013 31.3,32.8 v1(32,33.5)
  Bottom Layer w0.2: R13.1 32,30.925 v1(32,33.5) 33.25,33.5 33.825,32.925 R11.2
"+5V Reg PGOOD": R12.2 V1.15 | length 5
  Top Layer w0.2: v1(29.5,33.5) 29.5,33.365 29.75,33.115 V1.15
  Bottom Layer w0.2: R12.2 27.856,30.781 27.856,31.269 29.495,32.907 29.495,33.495 v1(29.5,33.5)
+5V_VIN: C12.2 C13.2 C17.2 C19.1 C20.1 C21.1 L2.2 R6.2 R7.2 R13.2 U2.1 V1.13 X3.17 X3.19 X6.1 X7.1 | length 65
  Top Layer w0.2: V1.13 30.75,33.115 31,33.365 v1(31,33.5) ; X3.17 31.4,37.49 31.64,37.25 37.5,37.25 v1(38,37.75) 31.911,37.75 31.8,37.861 X3.19 ; R7.2 48.5,23.5 X7.1
  Top Layer w0.3: R6.2 40,23.5 v1(39,22.5) 39,19.85 40,18.85 40,18.825 40.075,18.75 C12.2 C13.2 U2.1
  Bottom Layer w0.2: R13.2 30.825,33.19 31,33.365 v1(31,33.5) 31,34.75 34,37.75 v1(38,37.75)
  Bottom Layer w0.5: v1(38,37.75) 39,36.75 v1(39,22.5) 39,21.225 ; 47.75,22.25 49.75,22.25 X7.1
+12V: C15.2 D1.1 R1.2 R2.2 V2.1 | length 29.4
  Top Layer w0.4: v1(27.424,45.95) 27.424,47.33 27.594,47.5 39.254,47.5 39.424,47.33 v1(39.424,45.95)
  Bottom Layer w0.4: V2.1 21.875,36.249 22.175,36.549 C15.2 22.287,37.888 23.888,37.888 v1(24,37.775) 24,44.25 25.7,45.95 v1(27.424,45.95)
\FLT: F1.6 R16.2 TP2.1 | length 12.3
  Top Layer w0.2: TP2.1 18.381,29.631 20.369,29.631 21.75,28.25 21.75,26.325 v1(20.85,25.425) 20.175,24.75 F1.6
BATT_always_on: C1.2 C11.2 C16.2 C18.2 D2.2 F1.3 F1.4 Q3.3 Q4.3 R17.2 U1.10 U1.12 V2.3 | length 42.1
  Top Layer w0.2: Q3.3@5.905,26.075 6.03,26.2 U1.12 ; 6.5,29.5 6.575,29.425 C11.2 ; C1.2 C11.2 ; U1.10 9.25,28.425 8.5,29.175 8.5,29.2 8.275,29.425 C11.2
  Top Layer w0.3: F1.4 15.314,24.25 15.064,24 14.25,24 15,24.75 F1.3
  Bottom Layer w0.3: v1(14.25,24.075) 14.25,28.5 19.001,33.251 V2.3
  Bottom Layer w0.5: 5.75,24 5.825,24.075 R17.2 ; D2.2 13,19.55 R17.2 ; v1(14.25,24.075) R17.2 ; V2.3@21.925,33.251 22.175,33.001 C16.2
  other v1: 2.6,20.6 4.6,20.6 3.6,22.6 5.6,22.6 2.6,24.6 4.6,24.6 3.6,26.6 5.6,26.6 2.6,28.6 4.6,28.6
BATT_IN: C22.2 D3.2 Q4.1 U1.2 U1.3 X4.1 | length 19.1
  Top Layer w0.2: U1.2 8.75,22.135 9,21.885 v1(9,21.75) 9,21.848 9.25,22.098 U1.3
  Bottom Layer w0.2: v1(9,21.75) 9,20.5 11.25,18.25 11.25,14.576 12.5,13.326 X4.1@12.5,12 ; 15.5,7.75 15.7,7.95 ; v1(15.6,12.6) 15.63,12.57 15.63,12.12 15.75,12 C22.2
  Bottom Layer w1: 15.7,7.95 D3.2
  other v1: 9.6,4.6 15.6,4.6 10.6,6.6 12.6,6.6 14.6,6.6 9.6,8.6 11.6,8.6 13.6,8.6 15.6,8.6 2.6,10.6 4.6,10.6 3.6,12.6 5.6,12.6 2.6,14.6 4.6,14.6 6.6,14.6 8.6,14.6 10.6,14.6 2.175,18.505 3.445,18.505 4.715,18.505
BATT_MON: R8.1 R9.2 TP3.1 | length 13.9
  Top Layer w0.2: R8.1 9.45,19.775 9.45,18.295 9,17.845 TP3.1 10.25,16 13.25,16 14.25,17 14.25,19.75 14,20 R9.2
BATT_switched: C14.1 Q3.1 U1.9 X1.1 | length 9.9
  Top Layer w0.2: Q3.1@4.635,31.525 4.66,31.5 8.85,31.5 9.57,30.78 9.57,27.18 9.75,27 U1.9
  other v1: 3.285,31.495 4.555,31.495 5.825,31.495 -0.4,34.6 1.6,34.6 3.6,34.6 5.6,34.6 0.6,36.6 2.6,36.6 4.6,36.6 6.6,36.6 8.6,36.6 -0.4,38.6 1.6,38.6 3.6,38.6 5.6,38.6 15.6,38.6 0.6,40.6 2.6,40.6 4.6,40.6 10.6,40.6 14.6,40.6 9.6,42.6 11.6,42.6 13.6,42.6 15.6,42.6 10.6,44.6 14.6,44.6 15.6,46.6
Buzzer_Ctrl_1: Q1.1 R3.2 X3.8 | length 17.7
  Top Layer w0.2: R3.2 21.074,46.475 Q1.1 21.074,44.426 22.25,43.25 22.25,37.75 23.25,36.75 29,36.75 29.4,36.35 X3.8
Buzzer_Ctrl_2: Q2.1 R4.2 X3.10 | length 20
  Top Layer w0.2: X3.10 29.8,36.403 29.133,37.07 25.93,37.07 25,38 25,39.5 25.75,40.25 27.75,40.25 31.25,43.75 32.5,43.75 33.074,44.324 Q2.1 33.074,46.475 R4.2
CAP: C11.1 U1.11 | length 2.1
  Top Layer w0.2: C11.1 8.275,28.075 8.75,27.6 U1.11
Current_Sense_5V: U2.3 X7.2 | length 5.9
  Top Layer w0.3: U2.3 45.45,19.05 45.6,19.2 50.7,19.2 X7.2 X7.2@50.6,19.4
DGATE: Q4.2 U1.1 | length 6.6
  Top Layer w0.3: Q4.2 6.975,18.225 7.5,18.75 7.5,21.5 8.25,22.25 U1.1
Earth: L1.1 Mount1.1 Mount2.1 Mount3.1 Mount4.1 | length 61.4
  Top Layer w0.5: L1.1 Mount2.1
  Signal Layer w0.5: Mount3.1 7.5,7.5 18.75,7.5 22.75,3.5 37.25,3.5 41.25,7.5 52.5,7.5 Mount4.1
EN/UVLO: F1.2 R14.2 R17.1 | length 4.9
  Top Layer w0.2: v1(13,26.825) 14.575,25.25 F1.2
  Bottom Layer w0.2: R17.1 v1(13,26.825)
GND: C1.1 C2.1 C4.1 C5.1 C6.1 C7.1 C8.1 C9.1 C10.1 C12.1 C13.1 C14.2 C15.1 C16.1 C17.1 C18.1 C19.2 C20.2 C21.2 C22.1 D1.2 D2.1 D3.1 F1.8 F1.9 L1.2 Q1.2 Q2.2 R3.1 R4.1 R10.2 R11.1 R14.1 R15.1 R16.1 TP1.1 U1.7 U2.2 V1.4 V1.5 V1.7 V1.8 V1.10 V1.16 V2.2 X2.1 X3.1 X3.2 X5.1 X6.3 X7.3 | length 61.5
  Top Layer w0.2: U1.7@10.775,26.225 v1@11.475,26.225 ; v1(26,35.645) 26,35 26.5,34.5 27.75,34.5 28.2,34.95 X3.2 ; v1(26,38.355) 26,39 26.25,39.25 28,39.25 28.2,39.05 X3.1 ; v1(28.5,33.5) 29.25,32.75 V1.16 ; V1.10@31.612,30.713 35.413,30.713 36.175,31.475 C4.1 v1(37.25,31.5) ; C12.1 C13.1
  Top Layer w0.3: C1.1 C2.1 v1(10.25,33.25) ; v1(12.425,17.25) R10.2 ; F1.8 19,25.75 19.5,26.25 v1(19.5,28.25) ; v1(23.5,27) C9.1 24.314,28.1 24.789,28.575 C6.1 ; C7.1 35.211,28.575 35.686,28.1 C10.1 36.5,27.108 36.854,26.755 v1(36.854,26.646) ; C13.1 41.6,14.9 42.25,14.25 v1(43,14.25) 43,14.75 44.5,16.25 U2.2
  Top Layer w0.4: v1@11.475,26.225 v1(11.5,26.25) ; R3.1 19.762,46.488 19.762,45.113 v1(19.774,45.1) ; v1(28.7,28.5) V1.4 ; v1(31.3,28.5) V1.8 ; R4.1 31.762,46.488 31.762,45.113 v1(31.774,45.1) ; L1.2 55.5,36.781 55.6,36.681 v1(55.6,36.6)
  Bottom Layer w0.2: R14.1 13,29.25 v1(13.75,30) ; C18.1 v1(15.5,22.25) ; v1@19.537,28.212 R15.1@20.812,28.212 ; R11.1 36.5,30.75 v1(37.25,31.5)
  Bottom Layer w0.3: R15.1@20.812,28.212 R15.1
  Bottom Layer w0.4: V2.2@21.477,34.75 21.489,34.737 23.988,34.737 v1(24,34.725)
  other v1: 50.6,2.6 18,3.55 44.6,6.6 46.6,6.6 48.6,6.6 50.6,6.6 45.6,8.6 47.6,8.6 49.6,8.6 51.6,8.6 44.6,10.6 50.6,10.6 52.6,10.6 54.6,10.6 56.6,10.6 30,10.75 22.5,11.1 37.5,11.1 51.6,12.6 53.6,12.6 55.6,12.6 57.6,12.6 50.6,14.6 55.6,16.6 57.6,16.6 54.6,18.6 56.6,18.6 17.7,19.25 49.5,20.5 57.6,20.6 16.9,25 54.6,26.6 56.6,26.6 55.6,28.6 57.6,28.6 54.6,30.6 56.6,30.6 20.825,31.5 55.6,32.6 57.6,32.6 18.81,34.75 51.6,36.6 53.6,36.6 20.825,38 50.6,38.6 52.6,38.6 45.6,40.6 49.6,40.6 51.6,40.6 44.6,42.6 46.6,42.6 48.6,42.6 50.6,42.6 45.6,44.6 49.6,44.6 50.6,46.6
HGATE: Q3.2 R5.1 U1.8 | length 14.8
  Top Layer w0.2: U1.8 10.25,28 R5.1 10.325,28 v1(11.5,28)
  Signal Layer w0.4: v1(2.015,31.775) 3.903,29.887 10.613,29.887 11.5,29 v1(11.5,28)
Neopixel_Data: X3.14 X6.2 | length 24.1
  Top Layer w0.2: X3.14 30.6,36.559 30.861,36.82 39.43,36.82 46.5,29.75 X6.2
NetB1_1: B1.1 R2.1 | length 2
  Top Layer w0.4: v1(39.424,41.5) R2.1
NetB1_2: B1.2 Q2.3 | length 0.9
  Top Layer w0.4: Q2.3 32.462,42.862 32.462,42.038 v1@32.5,42
  other v1: 32.424,42
NetB2_1: B2.1 R1.1 | length 2
  Top Layer w0.4: v1(27.424,41.5) R1.1
NetB2_2: B2.2 Q1.3 | length 1.4
  Top Layer w0.4: v1(20.424,41.5) Q1.3
NetC2_2: C2.2 R5.2 | length 1.4
  Top Layer w0.2: R5.2 C2.2
NetC3_1: C3.1 V1.2 | length 3.6
  Top Layer w0.2: C3.1 25.175,31.475 25.937,30.713 V1.2
NetC3_2: C3.2 L2.1 V1.6 | length 11.1
  Top Layer w0.2: v1(23.75,33) 23.75,31.575 C3.2
  Bottom Layer w0.2: v1(23.75,33) 23.75,32.1 28.919,26.931 29.269,26.931 v1(30,26.2)
  other v1: 30,29.025
NetF1_7: F1.7 R15.2 | length 3.6
  Top Layer w0.2: F1.7 19.275,25.25 v1(20.85,26.825)
ORing_EN: U1.6 X3.4 | length 26.9
  Top Layer w0.2: U1.6 11.3,23.3 12.25,24.25 12.25,30 16,33.75 27.739,33.75 28.6,34.611 X3.4
OV: R9.1 R10.1 U1.5 | length 5.1
  Top Layer w0.2: U1.5 10.25,20.85 11.075,20.025 R9.1 R10.1
SCL_5V: R6.1 U2.5 X3.18 | length 24.2
  Top Layer w0.2: X3.18 31.4,34.897 32.047,34.25 40.25,34.25 43.55,30.95 R6.1 U2.5
SDA_5V: R7.1 U2.4 X3.20 | length 25
  Top Layer w0.2: X3.20 31.8,34.95 32,34.75 40.5,34.75 45.45,29.8 R7.1 U2.4
SW: R8.2 U1.4 | length 4.2
  Top Layer w0.2: R8.2 8.325,20.575 8.75,21 9.25,21 9.75,21.5 U1.4
VREG_IN: C5.2 C6.2 C7.2 C8.2 C9.2 C10.2 F1.5 V1.1 V1.3 V1.9 | length 55
  Top Layer w0.2: v1(26.5,31.5) 26.635,31.5 26.923,31.213 V1.1
  Top Layer w0.5: F1.5@18.05,24.25 v1(22.25,24.25) ; v1(22.25,29.9) C9.2 23.513,29.913 25.238,29.913 C5.2 C6.2 27.525,29.925 27.812,30.213 V1.3 ; V1.9 32.183,30.213 32.47,29.925 C7.2 C8.2 34.763,29.913 36.488,29.913 C10.2 v1(37.75,29.9)
  Bottom Layer w0.2: v1(22.25,29.9) 23,30.65 23,33.25 23.5,33.75 25.5,33.75 26.5,32.75 v1(26.5,31.5)
  Bottom Layer w0.5: v1(22.25,29.9) v1(22.25,24.25) 26,24.25 26.5,23.75 36.25,23.75 37.75,25.25 v1(37.75,29.9)
pads on no net: B1.MP B2.MP F1.1 U1.13 V1.14 V1.17 X3.3 X3.5 X3.6 X3.7 X3.9 X3.11 X3.12 X3.13 X3.15 X3.16 X3.MP

## Polygon pours and split planes (outlines as drawn)
GND on Top Layer "GND Top Power Poly" (solid, remove dead copper, shelved, pour order 214): 44,50 51.75,50 51.75,42 ccw(c53.75,42) 53.75,40 58,40 cw(c58,38) 60,38 60,10.5 cw(c58,10.5) 58,8.5 53.25,8.5 ccw(c53.25,6.5) 51.25,6.5 51.25,0 44,0 44,14 cw(c46,14) 46,16 51.5,16 ccw(c51.5,17.5) 53,17.5 53,31.5 ccw(c51,31.5) 51,33.5 46,33.5 cw(c45.998,35.498) 44,35.5
NetC3_2 on Top Layer "Inductor Output" (solid, remove dead copper, shelved, pour order 210): 29.8,30 30.2,30 30.2,27.75 32,27.75 32,24.75 28,24.75 28,27.75 29.8,27.75
BATT_always_on on Top Layer "Batt always on Top Poly" (solid, remove dead copper, shelved, pour order 211): 1,30.5 7,30.5 7,19.5 1,19.5
BATT_IN on Top Layer "Batt In Top Poly" (solid, remove dead copper, shelved, pour order 212): 0,19 5.25,19 5.25,16.997 ccw(c7.247,16.997) 7.247,15 14,15 cw(c14,13) 16,13 16,0 9,0 9,6.503 ccw(c7.003,6.503) 7.003,8.5 2,8.5 cw(c2,10.5) 0,10.5
BATT_switched on Top Layer "Batt switched Top Poly" (solid, remove dead copper, shelved, pour order 213): 7,41 ccw(c7.002,42.998) 9,43 9,50 16,50 16,37 cw(c14,37) 14,35 9,35 ccw(c9,33) 7,33 7,31 2.75,31 2.75,32 ccw(c0.75,32) 0.75,34 -0.5,34 cw(c-0.5,36) -2.5,36 -2.5,39 cw(c-0.5,39) -0.5,41
GND on Top Layer "Top GND Poly" (hatched 45Degree grid 0.508 track 0.203, remove dead copper, shelved, pour order 215): 60,0 60,50 -8.5,50 -8.5,0
NetC3_2 on Bottom Layer "Inductor Output" (solid, remove dead copper, shelved, pour order 227): 29.8,30 30.2,30 30.2,27.75 32,27.75 32,24.75 28,24.75 28,27.75 29.8,27.75
+5V_VIN on Bottom Layer "+5V VIN Poly" (solid, remove dead copper, shelved, pour order 223): 50.5,30.75 51,30.75 ccw(c51,32.25) 52.5,32.25 52.5,32.75 ccw(c51,32.75) 51,34.25 45.25,34.25 ccw(c45.25,32.25) 43.25,32.25 43.25,23.75 cw(c41.25,23.75) 41.25,21.75 23.5,21.75 ccw(c23.5,19.75) 21.5,19.75 21.5,16.5 ccw(c23,16.5) 23,15 46.5,15 ccw(c46.502,16.998) 48.5,17 48.5,28.75 cw(c50.5,28.75)
GND on Bottom Layer "GND Bottom Power Poly" (solid, remove dead copper, shelved, pour order 224): 44,50 51.75,50 51.75,42 ccw(c53.75,42) 53.75,40 58,40 cw(c58,38) 60,38 60,10.5 cw(c58,10.5) 58,8.5 53.25,8.5 ccw(c53.25,6.5) 51.25,6.5 51.25,0 44,0 44,14 cw(c46,14) 46,16 51.5,16 ccw(c51.5,17.5) 53,17.5 53,31.5 ccw(c51,31.5) 51,33.5 46,33.5 cw(c45.998,35.498) 44,35.5
BATT_always_on on Bottom Layer "Batt always on Bottom Poly" (solid, remove dead copper, shelved, pour order 220): 1,30.5 7,30.5 7,19.5 1,19.5
BATT_IN on Bottom Layer "Batt In Bottom Poly" (solid, remove dead copper, shelved, pour order 221): 0,19 5.25,19 5.25,16.997 ccw(c7.247,16.997) 7.247,15 14,15 cw(c14,13) 16,13 16,0 9,0 9,6.503 ccw(c7.003,6.503) 7.003,8.5 2,8.5 cw(c2,10.5) 0,10.5
BATT_switched on Bottom Layer "Batt switched Bottom Poly" (solid, remove dead copper, shelved, pour order 222): 7,41 ccw(c7.002,42.998) 9,43 9,50 16,50 16,37 cw(c14,37) 14,35 9,35 ccw(c9,33) 7,33 7,31 2.75,31 2.75,32 ccw(c0.75,32) 0.75,34 -0.5,34 cw(c-0.5,36) -2.5,36 -2.5,39 cw(c-0.5,39) -0.5,41
GND on Bottom Layer "Bottom GND Poly" (hatched 45Degree grid 0.508 track 0.203, remove dead copper, shelved, pour order 225): 60,0 60,50 -8.5,50 -8.5,0
GND on Poly Planning 2 "GND Bottom Power Poly" (solid, remove dead copper, shelved, pour order 226): 44,50 51.75,50 51.75,42 ccw(c53.75,42) 53.75,40 58,40 cw(c58,38) 60,38 60,10.5 cw(c58,10.5) 58,8.5 53.25,8.5 ccw(c53.25,6.5) 51.25,6.5 51.25,0 44,0 44,14 cw(c46,14) 46,16 51.5,16 ccw(c51.5,17.5) 53,17.5 53,31.5 ccw(c51,31.5) 51,33.5 46,33.5 cw(c45.998,35.498) 44,35.5
Earth on Signal Layer "Earth Poly" (solid, remove dead copper, shelved, pour order 218): 4,49.972 3.972,50 0,50 0,0 4,0
Earth on Signal Layer "Earth Poly" (solid, remove dead copper, shelved, pour order 217): 56,49.972 56.028,50 60,50 60,0 56,0
GND on Ground Layer "Power GND Poly" (solid, remove dead copper, shelved, pour order 216): 60,0 60,50 -8.5,50 -8.5,0

## Keep-outs
Keep-Out Layer:
  the board outline again, w0.2

## Silkscreen, mask and mechanical layers (free items; w line width, h text height)
Top Overlay:
  region: 28.771,9.182 28.363,9.182 28.363,10.273 29.453,10.273 29.453,10.272 29.454,10.272 29.454,9.182 28.772,9.182
  region: 24,15.422 24,15.728 25.089,15.728 25.089,15.726 25.091,15.726 25.091,14.637 24,14.637 24,15.421
  region: 34.909,14.973 34.909,15.726 34.91,15.726 34.91,15.728 36,15.728 36,14.637 34.909,14.637 34.909,14.972
  region: 31.636,10.186 31.636,9.182 30.545,9.182 30.545,10.272 30.546,10.272 30.546,10.273 31.636,10.273 31.636,10.188
  region: 27.292,16.819 28.363,16.819 28.363,15.728 31.636,15.728 31.636,16.819 32.727,16.819 32.727,14.637 31.636,14.637 31.636,12.455 32.727,12.455 32.727,14.637 34.909,14.637 34.909,13.547 34.907,13.547 34.907,13.546 33.818,13.546 33.818,12.455 34.907,12.455 34.907,12.454 34.909,12.454 34.909,11.364 36,11.364 36,9.182 34.909,9.182 34.909,10.273 33.819,10.273 33.819,10.275 33.818,10.275 33.818,11.364 32.727,11.364 32.727,10.275 32.726,10.275 32.726,10.273 31.636,10.273 31.636,11.364 28.363,11.364 28.363,10.273 27.274,10.273 27.274,10.275 27.272,10.275 27.272,11.364 26.181,11.364 26.181,10.275 26.18,10.275 26.18,10.273 25.091,10.273 25.091,9.182 24,9.182 24,11.364 25.091,11.364 25.091,12.454 25.092,12.454 25.092,12.455 26.181,12.455 26.181,13.546 25.092,13.546 25.092,13.547 25.091,13.547 25.091,14.637 27.272,14.637 27.272,12.455 28.363,12.455 28.363,14.637 27.272,14.637 27.272,16.819 27.29,16.819
  lines w0.2: 48.5,15 48.5,24.5 ; 48.5,34 48.5,24.5 ; 51.414,14 59.5,14 59.5,24.5 ; 51.5,35 59.5,35 59.5,24.5 ; 48.5,24.5 59.5,24.5 ; 28.625,18 28.625,20 31.375,20 31.375,18 28.625,18
  text "OUT+" at 17.8,39.751 h1.5 r90
  text "OUT-" at 43.7,39.751 h1.5 r90
  text "Neopixel" at 50.418,33.667 h1
  text "+5V" at 51.95,31.25 h1
  text "Data" at 51.95,29.25 h1
  text "GND" at 51.95,27.25 h1
  text "Current" at 50.834,23 h1
  text "+5V" at 51.95,20.75 h1
  text "Battery Tube / Base Board" at 24.085,20.684 h1
  text "S" at 51.95,18.75 h1
  text "V3" at 29.167,18.5 h1
  text "GND" at 51.95,16.75 h1
  text "Sense" at 51.667,14.7 h1
  text "IN+" at 17.8,6.476 h1.5 r90
  text "IN-" at 43.7,5.626 h1.5 r90
Bottom Overlay:
  region: 43.707,16.534 43.444,16.534 43.444,17.239 44.147,17.239 44.147,17.238 44.148,17.238 44.148,16.534 43.708,16.534
  region: 40.625,20.564 40.625,20.761 41.329,20.761 41.329,20.76 41.33,20.76 41.33,20.057 40.625,20.057 40.625,20.563
  region: 47.671,20.274 47.671,20.76 47.672,20.76 47.672,20.761 48.375,20.761 48.375,20.057 47.671,20.057 47.671,20.273
  region: 45.557,17.183 45.557,16.534 44.853,16.534 44.853,17.238 44.854,17.238 44.854,17.239 45.557,17.239 45.557,17.183
  region: 42.752,21.466 43.444,21.466 43.444,20.761 45.557,20.761 45.557,21.466 46.262,21.466 46.262,20.057 45.557,20.057 45.557,18.648 46.262,18.648 46.262,20.057 47.671,20.057 47.671,19.353 47.67,19.353 47.67,19.352 46.966,19.352 46.966,18.648 47.67,18.648 47.67,18.647 47.671,18.647 47.671,17.943 48.375,17.943 48.375,16.534 47.671,16.534 47.671,17.239 46.967,17.239 46.966,17.239 46.966,17.943 46.262,17.943 46.262,17.239 46.261,17.239 45.557,17.239 45.557,17.943 43.444,17.943 43.444,17.239 42.74,17.239 42.739,17.239 42.739,17.943 42.035,17.943 42.035,17.239 42.034,17.239 41.33,17.239 41.33,16.534 40.625,16.534 40.625,17.943 41.33,17.943 41.33,18.647 41.331,18.647 41.331,18.648 42.035,18.648 42.035,19.352 41.331,19.352 41.331,19.353 41.33,19.353 41.33,20.057 42.739,20.057 42.739,18.648 43.444,18.648 43.444,20.057 42.739,20.057 42.739,21.466 42.751,21.466
  lines w0.2: 9,0.3 9,14.26 ; 9,14.94 9,15 10.26,15 ; 9,36.26 9,35 16,35 16,38.26 ; 9,36.94 9,49.7 ; 10.94,15 16,15 16,12.94 ; 16,0.3 16,4.26 ; 16,4.94 16,8.26 ; 16,8.94 16,12.26 ; 16,38.94 16,42.26 ; 16,42.94 16,46.26 ; 16,46.94 16,49.7 ; 44,0.3 44,15 50.26,15 ; 44,49.7 44,35 51,35 51,38.26 ; 50.94,15 51.25,15 51.25,12.991 ; 51,38.94 51,42.26 ; 51,42.94 51,46.26 ; 51,46.94 51,49.7 ; 51.25,0.3 51.25,8.209 ; 51.25,8.991 51.25,12.209
  lines w0.254: 38.5,24.758 39.008,24.25 ; 39.008,25.258 38.5,24.75 45.75,24.75 45.75,32 46.258,31.492 ; 45.25,31.492 45.758,32 ; 54.992,41.492 55.5,42 55.5,40 ; 55.492,42 56,41.492
  text "OUT+" at 6.95,38.251 h1.5 r270
  text "M3" at 56.5,37.9 h1.2
  text "OUT-" at 41.95,35.3 h1.5 r270
  text "GND" at 42.083,33 h1
  text "FLT" at 18.333,30.25 h1
  text "Board" at 45,27.3 h1.2
  text "Dim" at 45,25.5 h1.2
  text "50mm" at 46.5,25.076 h1.2 r270
  text "60mm" at 44.324,23.05 h1.2
  text "BMON" at 7,17.5 h1
  text "IN+" at 6.95,9.376 h1.5 r270
  text "IN-" at 41.95,5.626 h1.5 r270
Poly Planning:
  lines w0.2: 2.75,30.97 7,30.97 7,33 cw(c9,33) 9,35 14,35 ccw(c14,37) 16,37 16,50 9,50 9,42.997 ; 2.75,31 2.75,32 ccw(c0.75,32) 0.75,34 -0.5,34 cw(c-0.5,36) -2.5,36 -2.5,39 cw(c-0.5,39) -0.5,41 7.003,41 ; 4,0 4,50 0,50 0,0.028 4,0.028 ; 5.25,16.997 5.25,19 0,19 0,10.5 ccw(c2,10.5) 2,8.5 7,8.5 cw(c7,6.5) 9,6.5 ; 5.25,17 ccw(c7.25,17) 7.25,15 ; 7,41 ccw(c7,43) 9,43 ; 7.247,15 14,15 cw(c14,13) 16,13 16,0 9,0 9,6.503 ; 46.5,15 ccw(c46.5,17) 48.5,17 ; 46.503,15 23,15 cw(c23,16.5) 21.5,16.5 21.5,19.75 cw(c23.5,19.75) 23.5,21.75 41.25,21.75 ccw(c41.25,23.75) 43.25,23.75 43.25,32.25 cw(c45.25,32.25) 45.25,34.25 51,34.25 cw(c51,32.75) 52.5,32.75 52.5,32.25 cw(c51,32.25) 51,30.75 50.5,30.75 ccw(c50.5,28.75) 48.5,28.75 48.5,16.997 ; 56,0 56,50 60,50 60,0.028 56,0.028 ; 7.003,41 7.003,41 ; 1,19.5 1,30.5 7,30.5 7,19.5 1,19.5 ; 28,24.75 28,27.75 29.75,27.75 29.75,30 30.25,30 30.25,27.75 32,27.75 32,24.75 28,24.75 ; 40,0 40,50 51.25,50 51.25,36 cw(c50.25,36) 50.25,35 ccw(c50.25,33.75) 49,33.75 49,16.25 ccw(c50.25,16.25) 50.25,15 cw(c50.25,14) 51.25,14 51.25,0 40,0
Poly Planning 2:
  lines w0.2: 44,0 44,14 cw(c46,14) 46,16 51.5,16 ccw(c51.5,17.5) 53,17.5 53,31.5 ccw(c51,31.5) 51,33.5 46,33.5 cw(c46,35.5) 44,35.5 44,50 51.75,50 51.75,49.5 51.75,42 ccw(c53.75,42) 53.75,40 58,40 cw(c58,38) 60,38 60,10.5 cw(c58,10.5) 58,8.5 53.25,8.5 ccw(c53.25,6.5) 51.25,6.5 51.25,0 44,0

## Text inside footprints (layer, text, board x,y; h text height)
C14: Bottom Overlay "+" at -0.4,38.218 h1.2 r90